# Altium PCB PCB1.PcbDoc
Units mm, origin at the board's own origin, x right, y up, seen from the top; angles counter-clockwise.
Board outline 79.5 x 40 mm, 4 copper layers (Top Layer, Inner 1, Inner 2, Bottom Layer), stack 0.603 mm thick; 62 components, 55 nets, 268 pads, 35 vias.
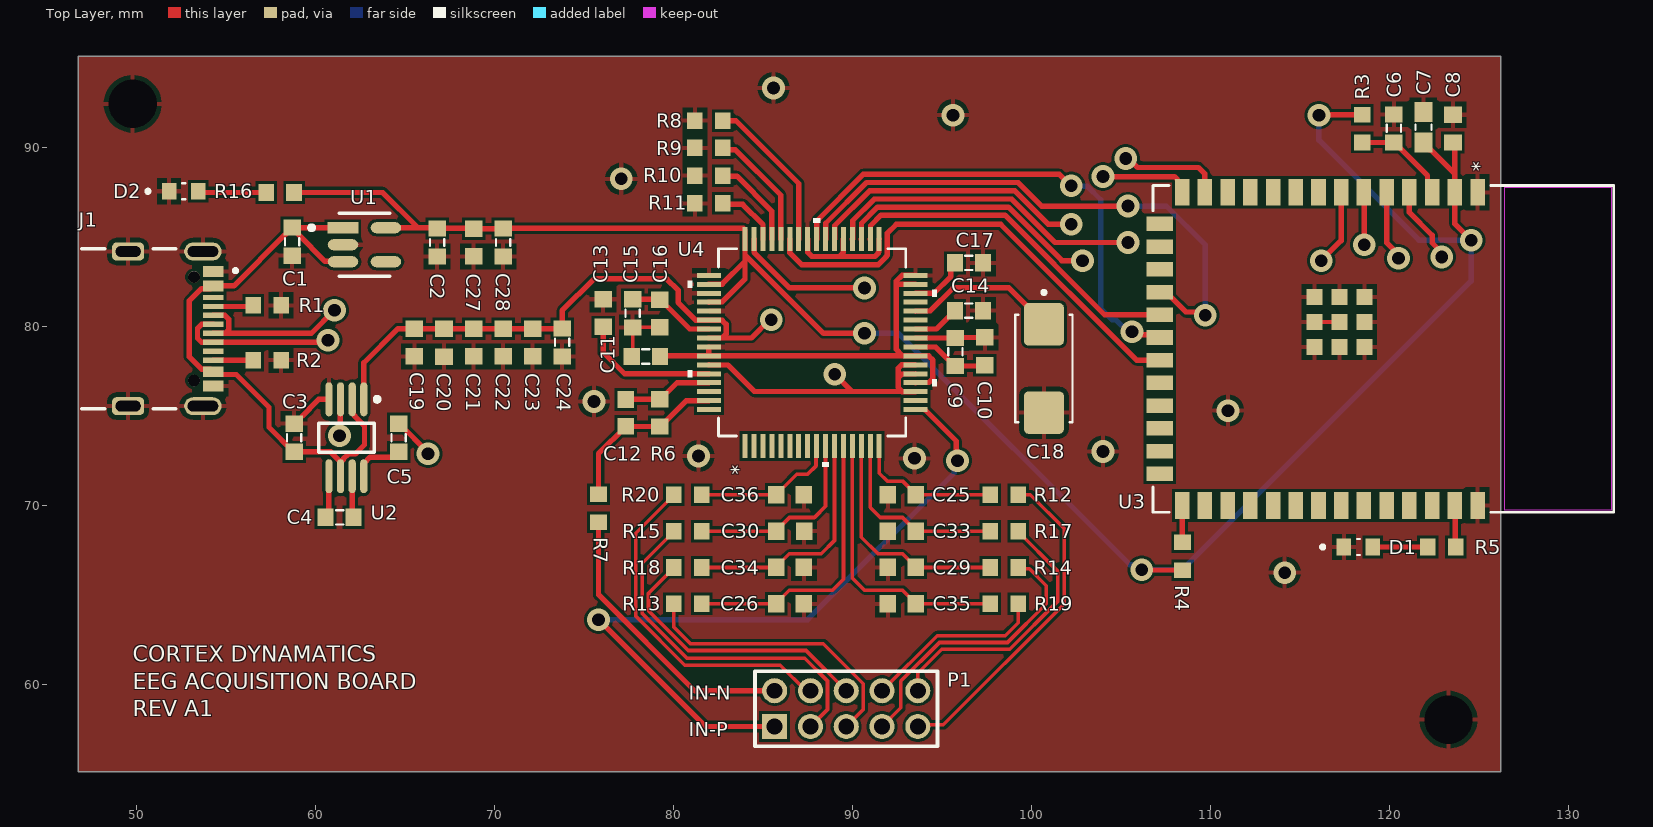
[diagram p0: Top Layer view]
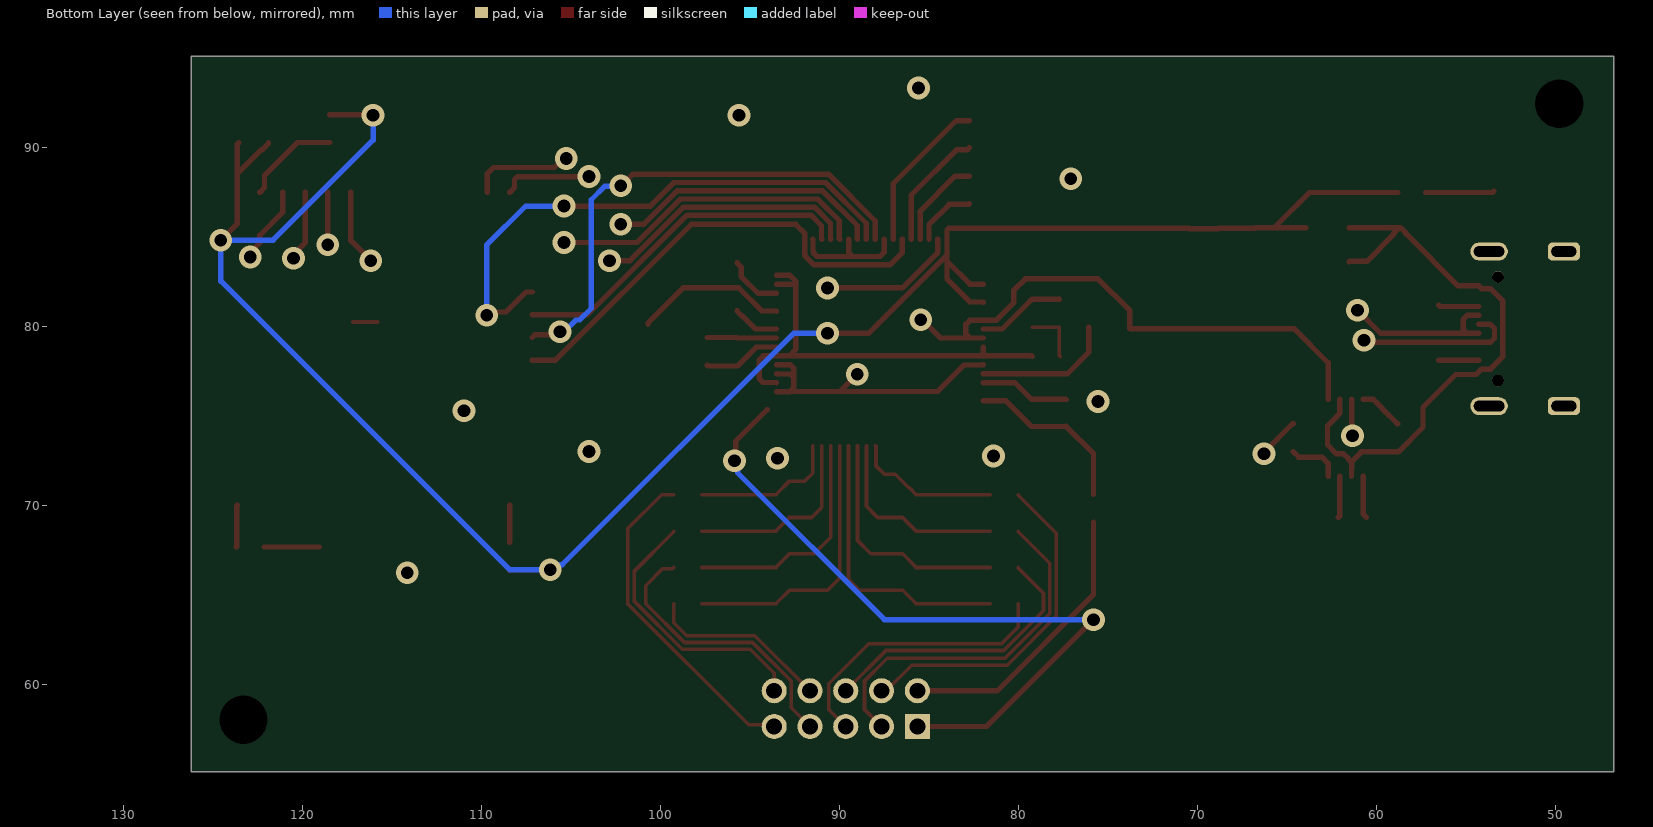
[diagram p1: Bottom Layer view, seen from below]
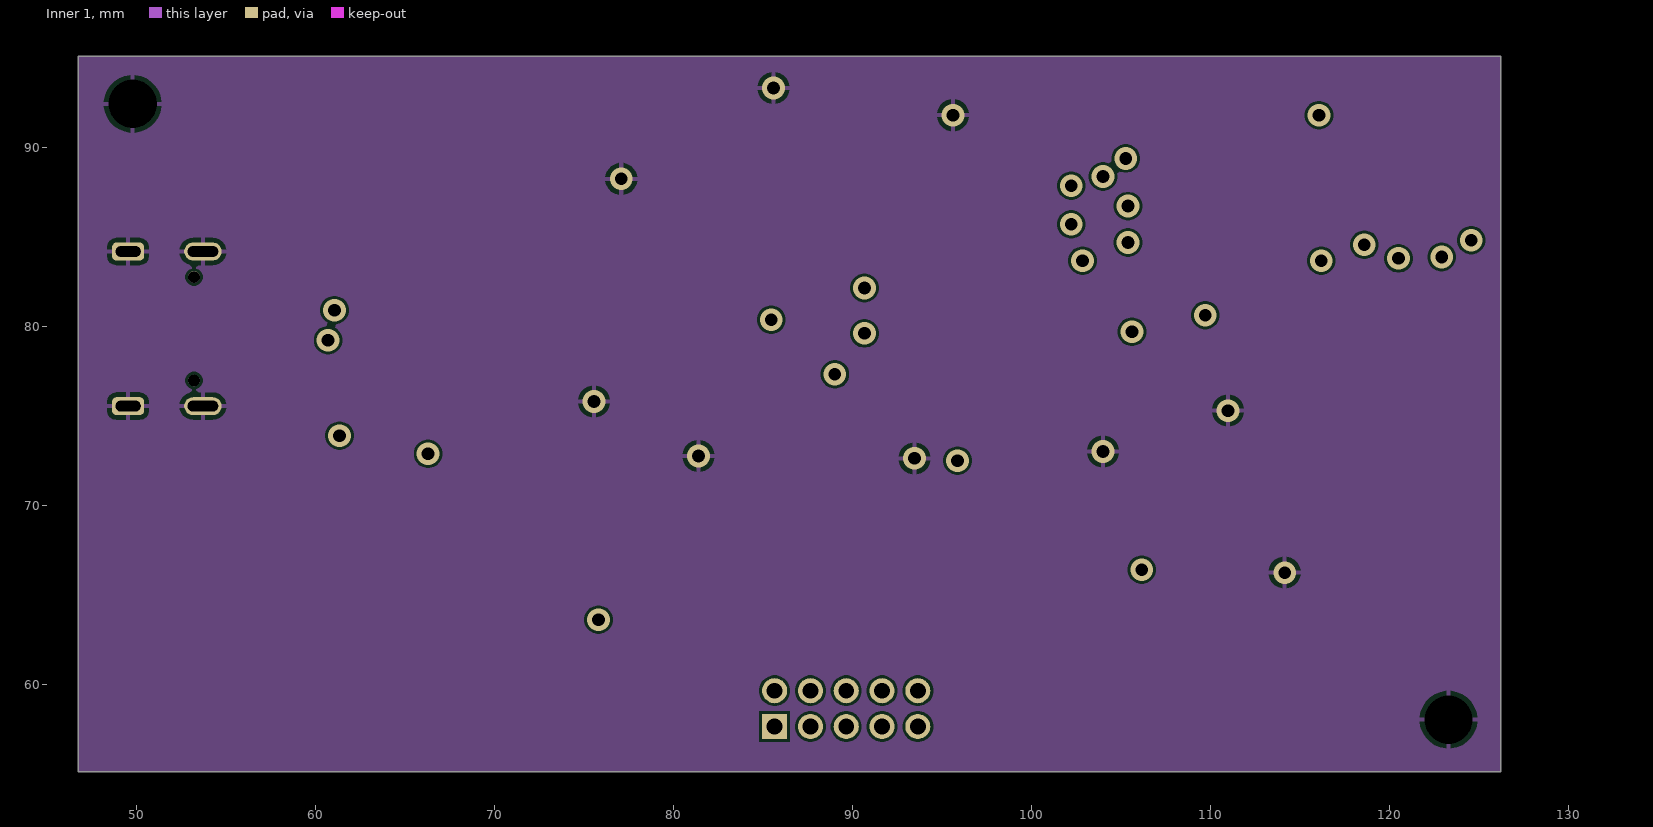
[diagram p2: Inner 1]
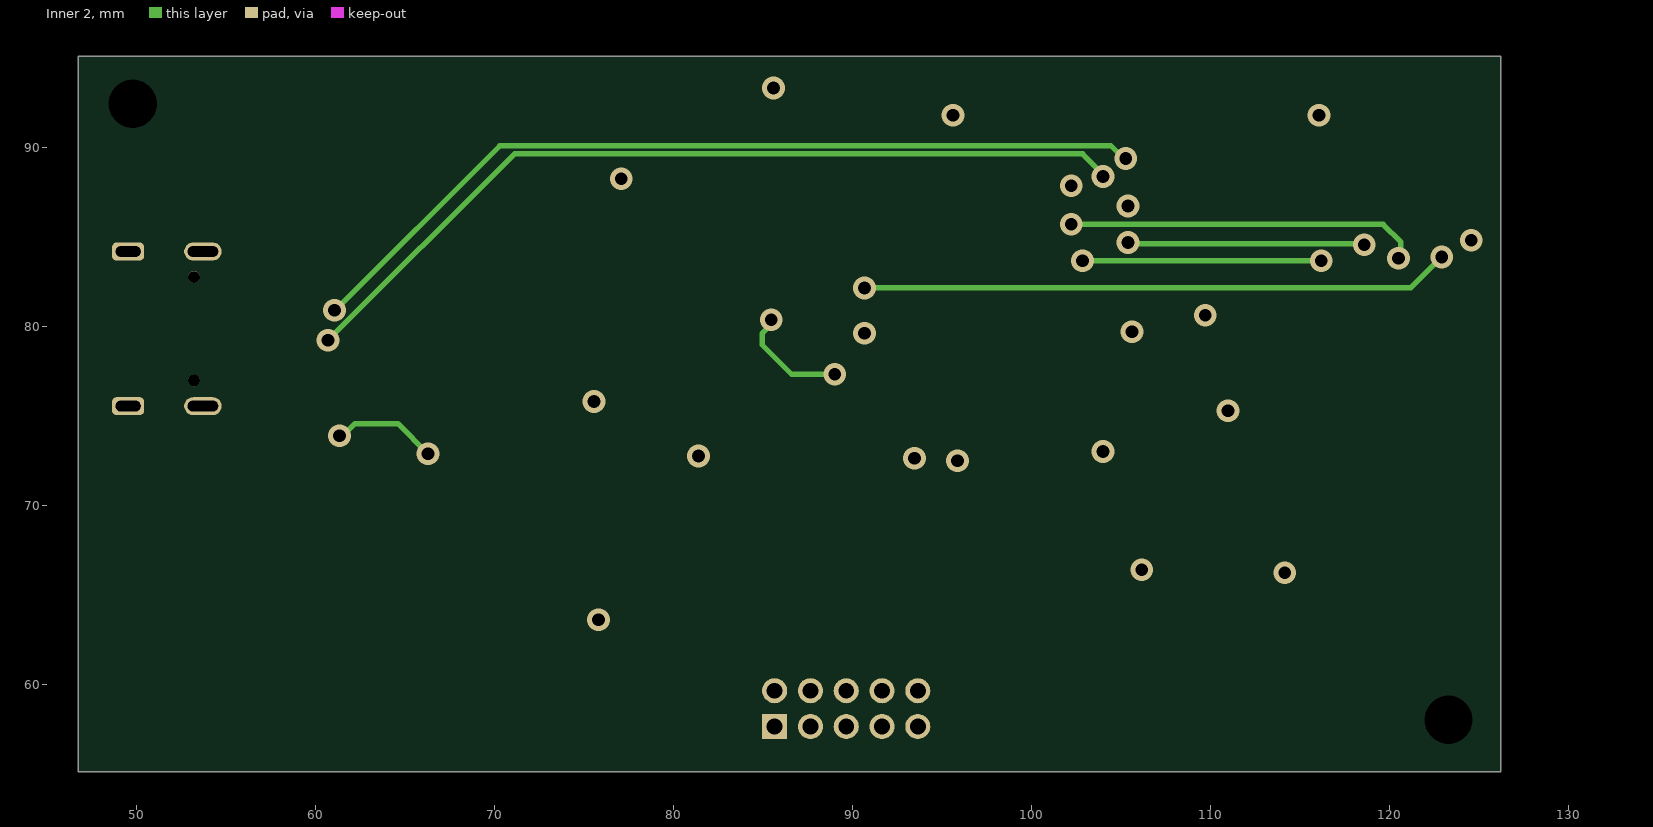
[diagram p3: Inner 2]
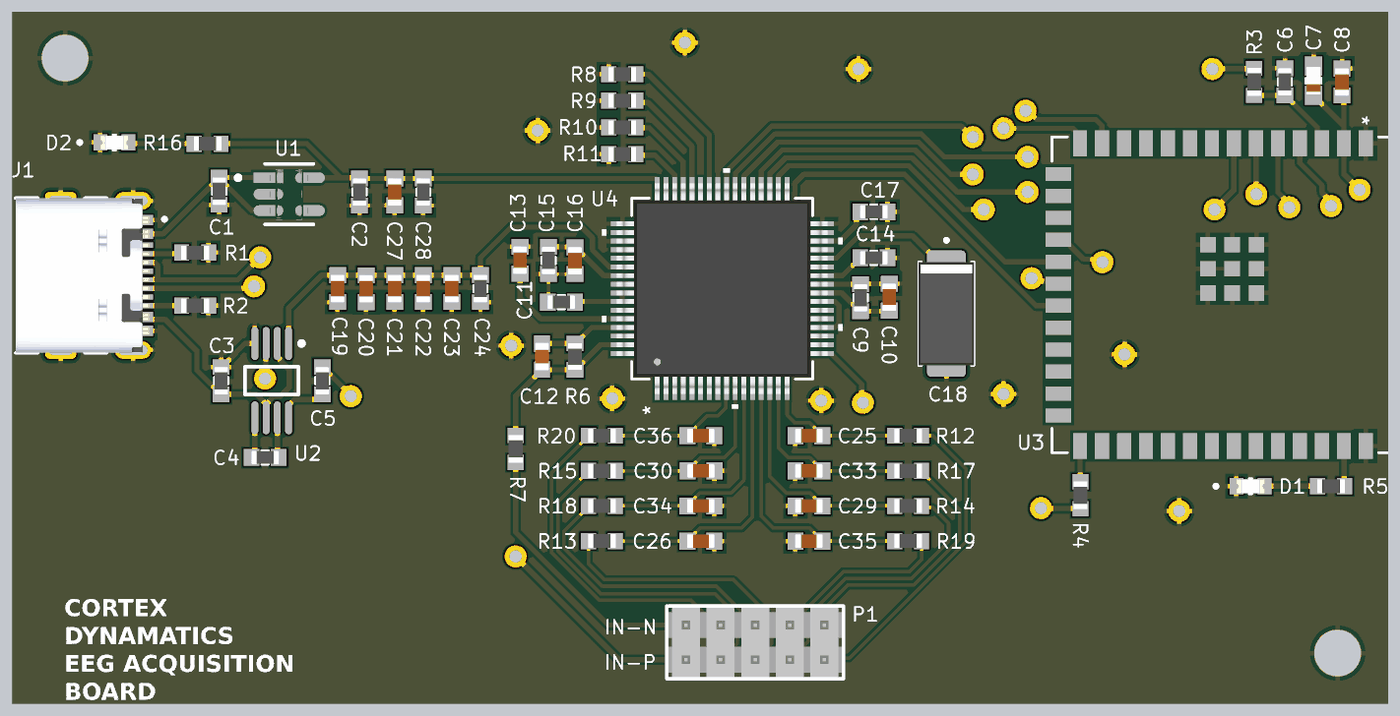
[diagram p4: 3D render of the assembled board from above, using the file's embedded part models]

## Layer stack, top to bottom
Top Solder: solder mask 0.0102, Solder Resist, Dk 3.5
Top Layer: signal copper 0.0356
Dielectric 2: prepreg 0.0711, PP-006, Dk 4.1
Inner 1: signal copper 0.035
Dielectric 1: dielectric 0.32, FR-4, Dk 4.8
Inner 2: signal copper 0.035
Dielectric 3: prepreg 0.0711, PP-006, Dk 4.1
Bottom Layer: signal copper 0.0356
Bottom Solder: solder mask 0.0102, Solder Resist, Dk 3.5

## Board outline
46.736,55.118 126.238,55.118 126.238,95.123 46.736,95.123

## Design rules (kind name [scope] priority, off if disabled: settings)
Clearance [All] p1: gap=0.152 ignorepadtopadclearanceinfootprint=FALSE
HoleSize [All] p1: absolutevalues=TRUE maxlimit=3 minlimit=0.025 maxpercent=80.000 minpercent=20.000
MinimumSolderMaskSliver [All] p1: minsoldermaskwidth=0
PolygonConnect [All] p1: connectstyle=Relief reliefconductorwidth=0.254 reliefentries=4 polygonreliefangle="90 Angle" airgapwidth=0.254
RoutingVias [All] p1: holewidth=0.711 width=1.27 viastyle="Through Hole" minholewidth=0.711 minwidth=1.27 maxholewidth=0.711 maxwidth=1.27
SilkToSilkClearance [All] p1: silktosilkclearance=0.1
SilkToSolderMaskClearance [IsPad] p1: minsilkscreentomaskgap=0.05 clearancetoexposedcopper=TRUE
SolderMaskExpansion [All] p1: expansion=0.102 istentingtop=FALSE
SupplyNets "Schematic Supply Nets" [InNet('GND')] p1: voltage=0.000
Width [All] p1: maxlimit=0.3 minlimit=0.203 preferedwidth=0.254
26 further rules are at their usual default settings.

## Components (designator, comment, footprint, x,y, rotation, side; value= is the part's Value field where it differs from the comment)
C1 "1uF" CAPC1608X95 58.693,84.755 r270 top
C2 "1uF" CAPC1608X95 66.802,84.709 r270 top
C3 "1uF" CAPC1608X95 58.806,73.796 r90 top
C4 "1uF" CAPC1608X95 61.346,69.351 r180 top
C5 "1uF" CAPC1608X95 64.648,73.796 r90 top
C6 "1uF" CAPC1608X95 120.269,91.082 r270 top
C7 "10uF" CAPC1608X90 121.92,91.147 r90 top
C8 "100nF" CAPC1608X90N 123.571,91.072 r270 top
C9 "1uF" CAPC1608X95 95.758,78.59 r270 top
C10 "100nF" CAPC1608X90N 97.409,78.626 r90 top
C11 "1uF" CAPC1608X95 78.463,78.336 r0 top
C12 "1.5nF" CAPC1608X87N 77.343,75.186 r90 top
C13 "100nF" CAPC1608X90N 76.073,80.762 r270 top
C14 "1uF" CAPC1608X95 96.52,80.899 r0 top
C15 "1uF" CAPC1608X95 77.724,80.749 r270 top
C16 "100nF" CAPC1608X90N 79.248,80.736 r90 top
C17 "1uF" CAPC1608X95 96.52,83.566 r0 top
C18 "100uF" CAPMP6032X280N 100.711,77.667 r270 top
C19 "100nF" CAPC1608X90N 65.532,79.121 r90 top
C20 "100nF" CAPC1608X90N 67.183,79.108 r90 top
C21 "100nF" CAPC1608X90N 68.834,79.121 r90 top
C22 "100nF" CAPC1608X90N 70.485,79.121 r90 top
C23 "100nF" CAPC1608X90N 72.136,79.121 r90 top
C24 "1uF" CAPC1608X95 73.787,79.121 r270 top
C25 "4.7nF" CAPC1608X90N 92.765,70.612 r0 top
C26 "4.7nF" CAPC1608X90N 86.522,64.516 r180 top
C27 "100nF" CAPC1608X90N 68.834,84.709 r90 top
C28 "1uF" CAPC1608X95 70.485,84.709 r270 top
C29 "4.7nF" CAPC1608X90N 92.765,66.548 r0 top
C30 "4.7nF" CAPC1608X90N 86.535,68.58 r180 top
C33 "4.7nF" CAPC1608X90N 92.765,68.58 r180 top
C34 "4.7nF" CAPC1608X90N 86.522,66.548 r0 top
C35 "4.7nF" CAPC1608X90N 92.765,64.516 r180 top
C36 "4.7nF" CAPC1608X90N 86.522,70.612 r0 top
D1 "LED_RED" LEDC1608X35N 118.285,67.691 r0 top
D2 "LED_RED" LEDC1608X35N 52.633,87.571 r0 top
J1 "USB4105GFA" GCT_USB4105GFA 49.53,79.883 r270 top
P1 "MTMM-105-04-F-D-135" SMTC-MTMM-105-04-X-D-135 85.662,57.658 r0 top
R1 "5.1k" RESC1608X55N 57.301,81.198 r180 top
R2 "5.1k" RESC1608X55N 57.301,78.137 r0 top
R3 "10k" RESC1608X55N 118.491,91.077 r270 top
R4 "10k" RESC1608X55N 108.458,67.165 r270 top
R5 "1k" RESC1608X55N 122.936,67.691 r180 top
R6 "1MR" RESC1508X55N 79.248,75.186 r90 top
R7 "100k" RESC1608X55N 75.819,69.85 r90 top
R8 "10k" RESC1608X55N 81.981,91.52 r180 top
R9 "10k" RESC1608X55N 81.981,89.995 r180 top
R10 "10k" RESC1608X55N 81.981,88.443 r180 top
R11 "10k" RESC1608X55N 81.981,86.896 r180 top
R12 "1k" RESC1608X55N 98.498,70.612 r180 top
R13 "1k" RESC1608X55N 80.802,64.516 r0 top
R14 "1k" RESC1608X55N 98.498,66.548 r180 top
R15 "1k" RESC1608X55N 80.802,68.58 r0 top
R16 "1k" RESC1608X55N 58.021,87.503 r180 top
R17 "1k" RESC1608X55N 98.498,68.58 r180 top
R18 "1k" RESC1608X55N 80.802,66.548 r0 top
R19 "1k" RESC1608X55N 98.498,64.516 r180 top
R20 "1k" RESC1608X55N 80.802,70.612 r0 top
U1 "AP2112K-3.3TRG1" FP-SOT25-IPC_A 62.738,84.582 r0 top
U2 "TPS60241DGKRG4" TI-DGK8_M 61.727,73.796 r270 top
U3 "ESP32-S3-WROOM-1-N8" ESP32-S3-WROOM-1_EXP 119.684,78.764 r270 top
U4 "ADS1299-4PAGR" PAG64_TEX 87.757,79.121 r90 top

## Footprints (in the part's own frame and the unit in brackets; to place one, negate y for a bottom-side part, rotate by r counter-clockwise, add the part's x,y. Pads: shape width x height; smd on the part's side, far side on the other; paste and mask are expansions set on the pad)
CAPC1608X87N [mm]
  rect 0.94x0.93 smd: 1(-0.745,0) 2(0.745,0)
  body extent -0.8,-0.4 0.8,0.4, height 0.95
CAPC1608X90 [mm]
  rect 1.1x1 smd paste+0 mask+0.102: 1(-0.85,0) 2(0.85,0)
  silkscreen extent -0.15,-0.45 0.15,0.45, body extent -0.8,-0.43 0.8,0.43, height 1
CAPC1608X90N [mm]
  rect 0.92x0.98 smd: 1(-0.775,0) 2(0.775,0)
  body extent -0.8,-0.41 0.8,0.41, height 0.9
CAPC1608X95 [mm]
  rect 0.9x0.97 smd: 1(-0.785,0) 2(0.785,0)
  silkscreen extent -0.2,-0.4 0.2,0.4, body extent -0.8,-0.4 0.8,0.4, height 0.95
CAPMP6032X280N [mm]
  rrect22% 2.37x2.23 smd paste+0 mask+0.102: 1(-2.47,0) 2(2.47,0)
  silkscreen extent -4.35,-1.6 3,1.6, body extent -3,-1.6 3,1.6, height 2.8
ESP32-S3-WROOM-1_EXP [mil]
  rect 59x32 smd paste+0 mask+0: 1(-344.49,207.09) 2(-344.49,157.09) 3(-344.49,107.09) 4(-344.49,57.09) 5(-344.49,7.09) 6(-344.49,-42.91) 7(-344.49,-92.91) 8(-344.49,-142.91) 9(-344.49,-192.91) 10(-344.49,-242.91) 11(-344.49,-292.91) 12(-344.49,-342.91) 13(-344.49,-392.91) 14(-344.49,-442.91) 27(344.49,-442.91) 28(344.49,-392.91) 29(344.49,-342.91) 30(344.49,-292.91) 31(344.49,-242.91) 32(344.49,-192.91) 33(344.49,-142.91) 34(344.49,-92.91) 35(344.49,-42.91) 36(344.49,7.09) 37(344.49,57.09) 38(344.49,107.09) 39(344.49,157.09) 40(344.49,207.09)
  rect 32x59 smd paste+0 mask+0: 15(-275,-492.13) 16(-225,-492.13) 17(-175,-492.13) 18(-125,-492.13) 19(-75,-492.13) 20(-25,-492.13) 21(25,-492.13) 22(75,-492.13) 23(125,-492.13) 24(175,-492.13) 25(225,-492.13) 26(275,-492.13)
  rect 35x35 smd paste+0 mask+0: 41(-59.06,-96.85) 42(-114.17,-41.73) 43(-114.17,-96.85) 44(-114.17,-151.97) 45(-59.06,-151.97) 46(-3.94,-151.97) 47(-3.94,-96.85) 48(-3.94,-41.73) 49(-59.06,-41.73)
  Top Layer keep-out region: 354.5,502 -354.5,502 -354.5,266 354.5,266
  silkscreen extent -360,-507 360,507
FP-SOT25-IPC_A [mm]
  rect 1.707x0.616 smd paste+0 mask+0: 1(-1.201,0.95)
  rrect100% 1.707x0.616 smd paste+0 mask+0: 2(-1.201,0) 3(-1.201,-0.95) 4(1.201,-0.95) 5(1.201,0.95)
  silkscreen extent -3.08,-1.75 1.4,1.75, body extent -2.55,-2 2.55,2, height 0.25
GCT_USB4105GFA [mm]
  rect 0.6x1.15 smd: A1_B12(-3.2,4.755) A4_B9(-2.4,4.755) B1_A12(3.2,4.755) B4_A9(2.4,4.755)
  rect 0.3x1.15 smd: A5(-1.25,4.755) A6(-0.25,4.755) A7(0.25,4.755) A8(1.25,4.755) B5(1.75,4.755) B6(0.75,4.755) B7(-0.75,4.755) B8(-1.75,4.755)
  oval 1x2.1 hole 0.6 slot 1.7 at 90 deg: SH1(-4.32,4.18) SH2(4.32,4.18)
  rrect50% 1x1.8 hole 0.6 slot 1.4 at 90 deg: SH3(-4.32,0) SH4(4.32,0)
  round 0.65 hole 0.65 unplated: ""(-2.89,3.68) ""(2.89,3.68)
  silkscreen extent -4.47,-2.6 4.47,6.1, body extent -4.47,-2.6 4.47,5.11, height 3.31
LEDC1608X35N [mm]
  rect 0.81x0.93 smd: A(0.81,0) C(-0.81,0)
  silkscreen extent -2.1,-0.45 0.09,0.45, body extent -0.8,-0.4 0.8,0.4, height 0.8
PAG64_TEX [mm]
  rect 1.341x0.279 smd paste+0 mask+0: 1(-5.776,3.75) 2(-5.776,3.25) 3(-5.776,2.75) 4(-5.776,2.25) 5(-5.776,1.75) 6(-5.776,1.25) 7(-5.776,0.75) 8(-5.776,0.25) 9(-5.776,-0.25) 10(-5.776,-0.75) 11(-5.776,-1.25) 12(-5.776,-1.75) 13(-5.776,-2.25) 14(-5.776,-2.75) 15(-5.776,-3.25) 16(-5.776,-3.75) 33(5.776,-3.75) 34(5.776,-3.25) 35(5.776,-2.75) 36(5.776,-2.25) 37(5.776,-1.75) 38(5.776,-1.25) 39(5.776,-0.75) 40(5.776,-0.25) 41(5.776,0.25) 42(5.776,0.75) 43(5.776,1.25) 44(5.776,1.75) 45(5.776,2.25) 46(5.776,2.75) 47(5.776,3.25) 48(5.776,3.75)
  rect 0.279x1.341 smd paste+0 mask+0: 17(-3.75,-5.776) 18(-3.25,-5.776) 19(-2.75,-5.776) 20(-2.25,-5.776) 21(-1.75,-5.776) 22(-1.25,-5.776) 23(-0.75,-5.776) 24(-0.25,-5.776) 25(0.25,-5.776) 26(0.75,-5.776) 27(1.25,-5.776) 28(1.75,-5.776) 29(2.25,-5.776) 30(2.75,-5.776) 31(3.25,-5.776) 32(3.75,-5.776) 49(3.75,5.776) 50(3.25,5.776) 51(2.75,5.776) 52(2.25,5.776) 53(1.75,5.776) 54(1.25,5.776) 55(0.75,5.776) 56(0.25,5.776) 57(-0.25,5.776) 58(-0.75,5.776) 59(-1.25,5.776) 60(-1.75,5.776) 61(-2.25,5.776) 62(-2.75,5.776) 63(-3.25,5.776) 64(-3.75,5.776)
  silkscreen extent -6.95,-6.95 6.95,6.95, body extent -6.1,-6.1 6.1,6.1, height 1.2
RESC1508X55N [mm]
  rect 0.9x0.97 smd paste+0 mask+0.102: 1(-0.76,0) 2(0.76,0)
  body extent -0.77,-0.4 0.77,0.4, height 0.55
RESC1608X55N [mm]
  rect 0.87x0.93 smd: 1(-0.78,0) 2(0.78,0)
  body extent -0.8,-0.4 0.8,0.4, height 0.55
SMTC-MTMM-105-04-X-D-135 [mm] "Terminal Strip Assembly, 2x5 Pins, Vertical, 2mm Pitch, Male"
  rect 1.4x1.4 hole 0.89: 1(0,0)
  round 1.4 hole 0.89: 2(0,2) 3(2,0) 4(2,2) 5(4,0) 6(4,2) 7(6,0) 8(6,2) 9(8,0) 10(8,2)
  silkscreen extent -1.1,-1.1 9.1,3.1, body extent -1,-1 9,3, height 4.93
TI-DGK8_M [mm] "SOP, 8-Leads, Body 3x3mm, Pitch 0.65mm, IPC Low Density"
  oval 1.9x0.4 smd: 1(-2.15,0.975) 2(-2.15,0.325) 3(-2.15,-0.325) 4(-2.15,-0.975) 5(2.15,-0.975) 6(2.15,-0.325) 7(2.15,0.325) 8(2.15,0.975)
  silkscreen extent -2.27,-1.55 0.8,1.85, body extent -1.55,-1.55 1.55,1.55, height 1.1

## Part data
C1 C2 C3 C4 C5 C6 C9 C11 C14 C15 C17 C24 C28: library part 1uF_0603, "1 ÂµF Â±10% 16V Ceramic Capacitor X7R 0603 (1608 Metric)", Package="0603 TDK", Check_prices=https://www.snapeda.com/parts/C1608X7R1C105K/TDK/view-part/?ref=eda, MF=TDK, MP=C1608X7R1C105K, SnapEDA_Link=https://www.snapeda.com/parts/C1608X7R1C105K/TDK/view-part/?ref=snap
C7: library part 10uF_0603, "TACmicrochip,10 uF,6.3 V", Package="603-2 AVX", Check_prices=https://www.snapeda.com/parts/TACL106K006RTA/AVX/view-part/?ref=eda, MF=AVX, MP=TACL106K006RTA, SnapEDA_Link=https://www.snapeda.com/parts/TACL106K006RTA/AVX/view-part/?ref=snap
C8 C10 C13 C16 C19 C20 C21 C22 C23 C27: library part 100nF_0603, "Capacitor MLCC 0603 100nF 16V", Package="1608 AVX", Check_prices=https://www.snapeda.com/parts/0603YC104KAZ2A/AVX/view-part/?ref=eda, MF=AVX, MP=0603YC104KAZ2A, SnapEDA_Link=https://www.snapeda.com/parts/0603YC104KAZ2A/AVX/view-part/?ref=snap
C12: library part 1.5nF_0603, "0603 X7R ceramic capacitor, 100V 1.5nF", Package="1608 KEMET", Check_prices=https://www.snapeda.com/parts/C0603C152K1RACTU/Kemet/view-part/?ref=eda, MF=Kemet, MP=C0603C152K1RACTU, SnapEDA_Link=https://www.snapeda.com/parts/C0603C152K1RACTU/Kemet/view-part/?ref=snap
C18: library part 100uF_tantalum_6032, "100 ÂµF Molded Tantalum Capacitors 10 V 2312 (6032 Metric) 200mOhm", Package=Package, Check_prices=https://www.snapeda.com/parts/593D107X9010C2TE3/Vishay/view-part/?ref=eda, MF="Vishay Sprague", MP=593D107X9010C2TE3, SnapEDA_Link=https://www.snapeda.com/parts/593D107X9010C2TE3/Vishay/view-part/?ref=snap
C25 C26 C29 C30 C33 C34 C35 C36: library part 4.7nF_ceramic_0603, "C Series 0603 4.7 nF 25 V ±5 % Tolerance C0G SMT Multilayer Ceramic Capacitor", Package="1608 TDK", Check_prices=https://www.snapeda.com/parts/C1608C0G1E472J080AA/TDK/view-part/?ref=eda, MF=TDK, MP=C1608C0G1E472J080AA, SnapEDA_Link=https://www.snapeda.com/parts/C1608C0G1E472J080AA/TDK/view-part/?ref=snap
D1 D2: "Red 631nm LED Indication - Discrete 2V 0603 (1608 Metric)", Package="0603 Lite-On", Availability="In Stock", Check_prices=https://www.snapeda.com/parts/LTST-C190KRKT/Lite-On+Inc./view-part/?ref=eda, MF="Lite-On Inc.", MP=LTST-C190KRKT, Price=None, Purchase-URL=https://pricing.snapeda.com/search/part/LTST-C190KRKT/?ref=eda, SnapEDA_Link=https://www.snapeda.com/parts/LTST-C190KRKT/Lite-On+Inc./view-part/?ref=snap
J1: "USB-C (USB TYPE-C) USB 2.0 Receptacle Connector 24 (16+8 Dummy) Position Surface Mount, Right Angle; Through Hole", Package=None, Check_prices=https://www.snapeda.com/parts/USB4105GFA/Global+Connector+Technology/view-part/?ref=eda, MF="Global Connector Technology", MP=USB4105GFA, SnapEDA_Link=https://www.snapeda.com/parts/USB4105GFA/Global+Connector+Technology/view-part/?ref=snap
P1: library part CMP-1029-00113-1, "Modified Through-Hole Header, Vertical, -55 to 125 degC, 2 mm Pitch, 10-Pin, Male, RoHS", Manufacturer=Samtec, Temperature Range="-55 to 125 degC", ComponentLink1Description="Manufacturer URL", ComponentLink1URL=http://www.samtec.com, ComponentLink2Description=Datasheet, ComponentLink2URL=http://d2a072wq521u33.cloudfront.net/catalog_english//MTMM_TH.PDF, ComponentLink3Description="Package Specification", ComponentLink3URL=http://www.samtec.com/documents/webfiles/cpdf/MTMM-1XX-XX-XX-X-XXX-XX-XXX-MKT.pdf, DatasheetVersion=F-214, Mounting Technology=Through-hole, Orientation=Vertical, PackageDescription="2mm Terminal Strip Assembly", PackageReference=MTMM-105-04-X-D-135, PackageVersion="AE, 12/1993", PartNumber=MTMM-105-04-F-D-135, Pitch="2 mm", RoHS=True
R1 R2: library part 5.1kR_0603, "Res Thick Film 0603 5.1K Ohm 1% 0.1W(1/10W) Â±100ppm/Â°C Pad SMD Automotive T/R", Package="1608 Yageo", Check_prices=https://www.snapeda.com/parts/AC0603FR-135K1L/Yageo/view-part/?ref=eda, MF=Yageo, MP=AC0603FR-135K1L, SnapEDA_Link=https://www.snapeda.com/parts/AC0603FR-135K1L/Yageo/view-part/?ref=snap
R3 R4 R8 R9 R10 R11: library part 10kR_0603, "Resistor, AS 0603 10k 1% 100mW TC100", Package="0603-2 Bourns", Check_prices=https://www.snapeda.com/parts/CR0603AFX-1002EAS/Bourns/view-part/?ref=eda, MF=Bourns, MP=CR0603AFX-1002EAS, SnapEDA_Link=https://www.snapeda.com/parts/CR0603AFX-1002EAS/Bourns/view-part/?ref=snap
R5 R12 R13 R14 R15 R16 R17 R18 R19 R20: library part 1kR_0603, "DirenÃ§, AS 0603 1k %1 100mW TC100", Package="0603-2 Bourns", Check_prices=https://www.snapeda.com/parts/CR0603AFX-1001EAS/Bourns/view-part/?ref=eda, MF=Bourns, MP=CR0603AFX-1001EAS, SnapEDA_Link=https://www.snapeda.com/parts/CR0603AFX-1001EAS/Bourns/view-part/?ref=snap
R6: library part 1MR_0603, "Precision Thin Film Smnt Resistor 0603 Case 1MOhm +/-0.1% 0.063W +/-25ppm/C", Package=0603, Power_Rating=".063 W", Resistance=1M, Tolerance=.1%, Voltage_Rating="50 V", Check_prices=https://www.snapeda.com/parts/CPF0603B1M0E/TE+Connectivity+Passive+Product/view-part/?ref=eda, EU_RoHS_Compliance=Compliant, MF="TE Connectivity", MP=CPF0603B1M0E, SnapEDA_Link=https://www.snapeda.com/parts/CPF0603B1M0E/TE+Connectivity+Passive+Product/view-part/?ref=snap
R7: library part 100kR_0603, "Fixed Resistor CRGCQ 0603 100K 5%", Package="0603-2 TE Connectivity", Check_prices=https://www.snapeda.com/parts/CRGCQ0603J100K/TE+Connectivity/view-part/?ref=eda, MF="TE Connectivity", MP=CRGCQ0603J100K, SnapEDA_Link=https://www.snapeda.com/parts/CRGCQ0603J100K/TE+Connectivity/view-part/?ref=snap
U1: library part CMP-12756-000035-1, "IC REG LINEAR 3.3V 600MA SOT25", Case/Package=SOT-23-5, Dropout Voltage=250mV, Max Input Voltage=6V, Max Operating Temperature=85°C, Max Output Current=600mA, Min Input Voltage=2.5V, Min Operating Temperature=-40°C, Output Voltage=3.3V, Package Quantity=1, Quiescent Current=55uA, Accuracy=1.5%, Height=1.3mm, Lead Free="Lead Free", Length=3.1mm, Mount="Surface Mount", Number of Outputs=1, Number of Pins=5, Number of Regulators=1, Output Current=600mA, Output Type=Fixed, Packaging="Tape and Reel", Polarity=Positive, Width=1.7mm
U2: library part CMP-0391-00067-1, "5 V, Boost Charge Pump, 25 mA, 2.7 to 5.5 V Input with 2-Cell Alkaline / Nixx Input, -40 to 85 degC, 8-pin SOP (DGK8), Green (RoHS & no Sb/Br)", Manufacturer="Texas Instruments", Switching Frequency(Max)(kHz)=220, 2-Cell Alkaline/Nixx Input=TRUE, Code_JEDEC=MO-187, ComponentLink1Description="Manufacturer URL", ComponentLink1URL=http://www.ti.com/, ComponentLink2Description=Datasheet, ComponentLink2URL=http://www.ti.com/general/docs/lit/getliterature.tsp?genericPartNumber=TPS60241&fileType=pdf, ComponentLink3Description="Package Specification", ComponentLink3URL=http://www.ti.com/litv/pdf/mpds028d, DatasheetVersion=SLVS372B, Eco-Plan="Green (RoHS & no Sb/Br)", Efficiency(Typ)(%)=90.8, Iout(Max)(A)=0.025, Iq(Typ)(mA)=0.25, Mounting Technology="Surface Mount", PackageDescription="8-Pin Thin Small Outline Package 3 x 3 mm Body ,0.65 mm Pitch", PackageReference=DGK8, PackageVersion=4073329/E, PartNumber=TPS60241DGKRG4, Preset Vout(V)=5, Topology=Boost, Vin(Max)(V)=5.5, Vin(Min)(V)=2.7, Vout(Max)(V)=5.125, Vout(Min)(V)=4.875
U3: "Description", Manufacturer_Name="Espressif Systems", Copyright="Copyright (C) 2026 Ultra Librarian. All rights reserved.", Manufacturer_Part_Number=ESP32-S3-WROOM-1-N8, RefDes=RefDes, Type="Transceiver module"
U4: "Low-Noise, 4-Channel, 24-Bit Analog-to-Digital Converter for Biopotential Measurements 64-TQFP -40 to 85", Manufacturer_Name="Texas Instruments", Copyright="Copyright (C) 2025 Ultra Librarian. All rights reserved.", Manufacturer_Part_Number=ADS1299-4PAGR, RefDes=RefDes, Type=Type

## Free pads (board coordinates)
  round 0.889 hole 2.7: e(123.317,58.039) M1(49.784,92.456)

## Via types
v1: diameter 1.27, hole 0.711, Top Layer to Bottom Layer, 35 vias

## Nets (pads, with @x,y where several pads share a name; then routed paths per layer and width w, separated by ;. In a path a pad name is that pad's centre, name@x,y a point inside that pad or via, vN(x,y) a via of type N, cw(c..) or ccw(c..) an arc to the next point about the centre after c; other vN are vias at no path point)
3V3: C2.1 C7.1 C8.2 C27.2 C28.1 R3.1 R4.2 R16.1 U1.5 U3.2 U4.48 U4.50 U4.52 | length 117.9
  Top Layer w0.3: R16.1 63.754,87.503 65.725,85.532 ; U1.5 65.725,85.532 ; U4.52 81.992,81.381 82.729,81.381 84.007,82.659 84.007,83.659 ; U4.50 81.992,82.381 82.729,82.381 84.007,83.659 ; v1(90.678,79.629) 88.392,79.629 84.007,84.014 ; v1(106.172,66.421) 106.19,66.403 108.44,66.403 R4.2 ; v1(116.078,91.821) 116.096,91.839 118.473,91.839 R3.1 ; C7.1 121.92,90.247 122.27,89.897 122.32,89.897 123.674,88.543 ; C8.2 123.674,90.194 123.674,88.543 ; v1(124.587,84.836) 123.674,85.749 U3.2 123.674,88.543 ; 65.725,85.532 66.764,85.532 C2.1 68.824,85.494 C27.2 70.475,85.484 C28.1 83.92,85.494 84.007,85.407 U4.48 84.007,84.014 ; 84.007,83.659 84.007,84.014
  Bottom Layer w0.3: v1(90.678,79.629) 92.583,79.629 105.514,66.698 105.633,66.698 105.91,66.421 v1(106.172,66.421) 108.458,66.421 124.587,82.55 v1(124.587,84.836) 121.666,84.836 116.078,90.424 v1(116.078,91.821)
5V: C19.2 C20.2 C21.2 C22.2 C23.2 C24.1 U2.1 U4.19 U4.21 U4.22 U4.54 U4.56 U4.59 | length 54.5
  Top Layer w0.3: U2.1 62.702,77.988 64.61,79.896 C19.2 67.17,79.896 C20.2 67.196,79.896 C21.2 C22.2 C23.2 73.777,79.896 73.789,79.908 73.789,80.901 75.565,82.677 79.629,82.677 80.264,82.042 80.264,81.351 81.009,80.606 81.244,80.371 U4.54 81.992,80.361 82.729,80.361 82.954,80.136 82.954,79.606 82.719,79.371 ; U4.59 81.992,77.861 83.048,77.861 84.528,76.381 89.989,76.381 ; U4.56 81.983,79.373 82.719,79.373 84.361,79.373 85.379,80.391 v1(85.471,80.391) ; v1(89.027,77.343) 89.989,76.381 ; 92.785,76.371 U4.19 ; U4.21 93.522,77.361 92.782,77.361 92.56,77.139 ; U4.22 92.759,77.871 92.56,77.672 92.56,77.139 ; 89.989,76.381 92.785,76.381 92.56,76.606 92.56,77.139
  Inner 2 w0.3: v1(85.471,80.391) 85.471,80.129 84.963,79.621 84.963,78.994 86.614,77.343 v1(89.027,77.343)
BIAS_ELECTRODE: P1.2 R7.1 | length 16.1
  Top Layer w0.3: R7.1 75.819,65.024 81.185,59.658 P1.2
BIASINV: C12.2 R6.2 U4.61 | length 5
  Top Layer w0.3: C12.2 77.358,75.946 R6.2 ; R6.2@79.283,75.946 80.208,76.871 U4.61
BIASOUT: C12.1 R6.1 R7.2 U4.63 | length 9.7
  Top Layer w0.3: R7.2 75.819,72.912 77.343,74.436 C12.1 77.358,74.426 R6.1 ; R6.1@79.283,74.426 80.728,75.871 U4.63
CS: U3.18 U4.39 | length 31.5
  Top Layer w0.3: U4.39 88.517,84.907 88.517,85.784 90.792,88.059 99.266,88.059 100.584,86.741 v1(105.41,86.741) ; U3.18 107.527,81.939 108.643,80.823 109.55,80.823 v1(109.728,80.645)
  Bottom Layer w0.3: v1(105.41,86.741) 107.545,86.741 109.728,84.558 v1(109.728,80.645)
D+: J1.A6 J1.B6 U3.14 | length 62.2
  Top Layer w0.3: J1.A6 53.632,80.133 53.408,79.908 53.408,79.358 53.632,79.133 60.591,79.133 v1(60.706,79.248) ; v1(104.013,88.392) 108.002,88.392 108.178,88.216 108.178,87.77 U3.14
  Inner 2 w0.3: v1(60.706,79.248) 71.12,89.662 102.87,89.662 104.013,88.519 v1(104.013,88.392)
D-: J1.A7 J1.B7 U3.13 | length 63.3
  Top Layer w0.3: J1.A7 54.938,79.633 ; J1.B7 54.938,80.633 55.162,80.408 55.162,79.858 54.938,79.633 ; v1(61.059,80.927) 59.765,79.633 54.938,79.633 ; v1(105.283,89.408) 105.436,89.408 105.944,88.9 109.347,88.9 109.704,88.543 U3.13
  Inner 2 w0.3: v1(61.059,80.927) 61.115,80.927 70.302,90.114 104.455,90.114 105.161,89.408 v1(105.283,89.408)
DRDY: U3.4 U4.47 | length 45.1
  Top Layer w0.3: U4.47 84.517,84.886 84.517,84.149 86.497,82.169 v1(90.678,82.169) ; U3.4 121.134,86.384 122.404,85.114 122.404,84.693 122.936,84.161 v1(122.936,83.899)
  Inner 2 w0.3: v1(90.678,82.169) 121.206,82.169 v1(122.936,83.899)
GND: C1.2 C2.2 C3.2 C6.1 C7.2 C8.1 C9.1 C10.2 C11.1 C11.2 C13.1 C14.2 C15.2 C16.1 C17.2 C18.2 C19.1 C20.1 C21.1 C22.1 C23.1 C24.2 C25.1 C26.1 C27.1 C28.2 C29.1 C30.1 C33.2 C34.2 C35.2 C36.2 D1.C D2.C J1.A1_B12 J1.B1_A12 J1.SH1 J1.SH2 J1.SH3 J1.SH4 pad.e pad.M1 R1.1 R2.2 R8.2 R9.2 R10.2 R11.2 U1.2 U2.4 U3.1 U3.40 U3.41 U3.42 U3.43 U3.44 U3.45 U3.46 U3.47 U3.48 U3.49 U4.20 U4.23 U4.25 U4.31 U4.32 U4.33 U4.37 U4.41 U4.49 U4.51 U4.53 U4.57 U4.58 | length 42.3
  Top Layer w0.203: C11.1 77.724,78.382 C15.2 77.727,79.961 C16.1 ; U3.45 U3.41
  Top Layer w0.3: C3.2 58.841,74.581 59.656,75.396 59.656,75.431 60.171,75.946 U2.4 ; C11.2 79.283,78.371 U4.58 ; U4.57 U4.58 ; U4.41 87.517,84.886 87.517,84.149 87.742,83.924 89.272,83.924 ; U4.37 89.497,84.886 89.497,84.149 89.272,83.924 ; U4.33 91.497,84.886 91.497,84.184 91.449,84.137 91.449,84.101 91.272,83.924 89.272,83.924 ; U4.20 93.543,76.881 94.281,76.881 94.505,77.106 94.505,78.136 94.27,78.371 U4.23 92.795,78.371 ; U4.25 95.754,79.371 C9.1 95.784,79.401 C10.2 ; U4.31 92.531,82.371 92.456,82.296 ; U4.32 92.777,82.871 92.456,82.55 92.456,82.296 ; U4.58 92.795,78.371 ; 92.456,82.296 92.456,78.74 92.56,78.636 92.56,78.606 92.795,78.371
  other v1: 114.164,66.258 93.472,72.644 81.407,72.771 104.013,73.025 110.998,75.311 75.565,75.819 77.089,88.265 95.631,91.821 85.598,93.345
IN1N: C33.1 R17.2 U4.15 | length 10.7
  Top Layer w0.203: U4.15 91.007,69.902 91.567,69.342 92.808,69.342 93.54,68.61 C33.1 R17.2
IN1N_RAW: P1.10 R17.1 | length 15.3
  Top Layer w0.203: P1.10 93.662,60.642 94.996,61.976 98.806,61.976 101.473,64.643 101.473,66.355 99.278,68.55 R17.1
IN1P: C25.2 R12.2 U4.16 | length 8.3
  Top Layer w0.203: U4.16 91.507,71.815 91.948,71.374 92.808,71.374 93.54,70.642 C25.2 R12.2
IN1P_RAW: P1.9 R12.1 | length 18.6
  Top Layer w0.203: P1.9 93.755,57.751 95.089,57.751 101.854,64.516 101.854,68.707 99.949,70.612 R12.1
IN2N: C35.1 R19.2 U4.13 | length 15.7
  Top Layer w0.203: U4.13 90.007,65.949 90.678,65.278 92.808,65.278 93.54,64.546 C35.1 R19.2
IN2N_RAW: P1.8 R19.1 | length 10.2
  Top Layer w0.203: P1.8 94.742,62.738 98.552,62.738 99.278,63.464 R19.1
IN2P: C29.2 R14.2 U4.14 | length 13
  Top Layer w0.203: U4.14 90.507,68.243 91.44,67.31 92.808,67.31 93.54,66.578 C29.2 R14.2
IN2P_RAW: P1.7 R14.1 | length 15.9
  Top Layer w0.203: P1.7 92.708,58.704 92.708,60.196 94.869,62.357 98.679,62.357 100.838,64.516 100.838,65.532 99.899,66.471 99.354,66.471 R14.1
IN3N: C34.1 R18.2 U4.11 | length 13.4
  Top Layer w0.203: R18.2 C34.1 85.747,66.578 86.479,67.31 88.265,67.31 89.007,68.052 U4.11
IN3N_RAW: P1.6 R18.1 | length 15.9
  Top Layer w0.203: R18.1 80.022,66.518 78.613,65.109 78.613,64.125 80.83,61.907 87.413,61.907 P1.6
IN3P: C26.2 R13.2 U4.12 | length 16
  Top Layer w0.203: R13.2 C26.2 85.747,64.546 86.479,65.278 88.9,65.278 89.507,65.885 U4.12
IN3P_RAW: P1.5 R13.1 | length 16
  Top Layer w0.203: R13.1 80.022,63.218 80.955,62.286 88.383,62.286 90.616,60.053 90.616,58.612 P1.5
IN4N: C36.1 R20.2 U4.9 | length 8.2
  Top Layer w0.203: R20.2 C36.1 85.747,70.642 86.106,71 86.136,71 86.89,71.755 87.503,71.755 87.969,72.221 87.969,73.307 U4.9
IN4N_RAW: P1.4 R20.1 | length 19.1
  Top Layer w0.203: R20.1 80.022,70.582 77.902,68.462 77.902,63.83 80.645,61.087 85.979,61.087 87.408,59.658 P1.4
IN4P: C30.2 R15.2 U4.10 | length 10.9
  Top Layer w0.203: R15.2 C30.2 85.76,68.61 86.492,69.342 87.884,69.342 88.507,69.965 U4.10
IN4P_RAW: P1.3 R15.1 | length 20.2
  Top Layer w0.203: R15.1 80.022,68.55 78.257,66.785 78.257,63.977 80.767,61.468 87.349,61.468 88.616,60.201 88.616,58.612 P1.3
NetC4_1: C4.1 U2.7 | length 2.3
  Top Layer w0.3: U2.7 62.052,69.43 C4.1
NetC4_2: C4.2 U2.5 | length 2.4
  Top Layer w0.3: C4.2 60.752,69.542 U2.5
NetC5_1: C5.1 U2.8 | length 2.9
  Top Layer w0.3: U2.8 62.702,72.369 63.044,72.711 64.348,72.711 C5.1
NetC5_2: C5.2 U2.3 | length 10.4
  Top Layer w0.3: v1(61.341,73.914) 61.383,73.956 61.383,75.926 U2.3 ; C5.2 64.683,74.581 66.294,72.969 v1(66.294,72.898)
  Inner 2 w0.3: v1(61.341,73.914) 61.542,73.914 62.209,74.581 64.611,74.581 v1(66.294,72.898)
NetC6_2: C6.2 R3.2 U3.3 | length 5.5
  Top Layer w0.3: R3.2 C6.2 120.304,90.297 122.148,88.453 122.148,87.77 U3.3
NetC9_2: C9.2 C10.1 U4.24 | length 4.3
  Top Layer w0.3: U4.24 94.657,78.871 95.723,77.805 C9.2 97.363,77.805 C10.1
NetC13_2: C13.2 U4.60 | length 7.8
  Top Layer w0.3: C13.2 76.073,78.578 77.28,77.371 U4.60
NetC14_1: C14.1 U4.26 | length 2.6
  Top Layer w0.3: U4.26 94.707,79.871 95.4,80.564 95.435,80.564 95.735,80.864 C14.1
NetC15_1: C15.1 C16.2 U4.55 | length 4.9
  Top Layer w0.3: C15.1 79.225,81.534 C16.2 79.278,81.511 79.588,81.201 80.918,79.871 U4.55
NetC17_1: C17.1 U4.30 | length 3.2
  Top Layer w0.3: U4.30 94.561,81.871 95.51,82.82 95.51,83.341 C17.1
NetC18_1: C18.1 U4.28 | length 8.6
  Top Layer w0.3: U4.28 93.543,80.881 94.355,80.881 95.642,82.169 98.749,82.169 100.711,80.207 C18.1
NetD1_A: D1.A R5.2 | length 3.1
  Top Layer w0.3: D1.A R5.2
NetD2_A: D2.A R16.2 | length 3.8
  Top Layer w0.3: D2.A 53.51,87.503 R16.2
NetJ1_A5: J1.A5 R1.2 | length 2.3
  Top Layer w0.3: J1.A5 56.456,81.133 R1.2
NetJ1_B5: J1.B5 R2.1 | length 2.2
  Top Layer w0.3: J1.B5 56.517,78.133 R2.1
NetR4_1: R4.1 U3.27 | length 2.1
  Top Layer w0.3: U3.27 108.434,67.969 R4.1
NetR5_1: R5.1 U3.39 | length 2.3
  Top Layer w0.3: U3.39 123.695,69.993 123.695,67.712 R5.1
NetR8_1: R8.1 U4.42 | length 8.8
  Top Layer w0.3: R8.1 83.486,91.52 87.007,87.999 U4.42
NetR9_1: R9.1 U4.44 | length 6.8
  Top Layer w0.3: R9.1 82.871,89.885 83.47,89.885 86.007,87.348 U4.44
NetR10_1: R10.1 U4.45 | length 5.1
  Top Layer w0.3: R10.1@82.761,88.413 83.545,88.413 85.497,86.461 85.497,84.907 U4.45
NetR11_1: R11.1 U4.46 | length 3.5
  Top Layer w0.3: R11.1@82.761,86.866 82.79,86.837 83.876,86.837 85.007,85.706 U4.46
PWDN: U3.7 U4.35 | length 32.5
  Top Layer w0.3: U4.35 90.517,84.907 90.517,85.784 91.418,86.685 98.72,86.685 101.713,83.693 v1(102.87,83.693) ; v1(116.205,83.693) 117.324,84.812 U3.7
  Inner 2 w0.3: v1(102.87,83.693) v1(116.205,83.693)
REF_ELECTRODE: P1.1 U4.17 | length 40
  Top Layer w0.3: v1(75.819,63.627) 81.788,57.658 P1.1 ; U4.17@94.053,75.361 95.812,73.602 95.812,72.59 v1(95.885,72.517)
  Bottom Layer w0.3: v1(75.819,63.627) 87.503,63.627 95.699,71.823 95.699,72.331 v1(95.885,72.517)
RESET: U3.6 U4.36 | length 34.1
  Top Layer w0.3: U4.36 90.017,84.907 90.017,85.924 91.231,87.138 98.908,87.138 101.336,84.709 v1(105.41,84.709) ; U3.6 118.606,87.502 118.606,84.594 v1(118.618,84.582)
  Inner 2 w0.3: v1(105.41,84.709) 105.474,84.645 118.554,84.645 v1(118.618,84.582)
SPI_CLOCK: U3.20 U4.40 | length 28.6
  Top Layer w0.3: U4.40 88.017,84.907 88.017,85.924 90.605,88.512 101.577,88.512 102.205,87.884 v1(102.235,87.884) ; v1(105.628,79.72) 105.789,79.56 107.023,79.56 U3.20
  Bottom Layer w0.3: v1(102.235,87.884) 102.271,87.848 103.134,87.848 103.886,87.096 103.886,81.026 104.537,80.375 104.749,80.375 105.404,79.72 v1(105.628,79.72)
SPI_MISO: U3.21 U4.43 | length 26.5
  Top Layer w0.3: U4.43 86.507,84.123 86.937,83.693 86.95,83.693 87.171,83.472 89.629,83.472 91.459,83.472 91.902,83.914 91.902,83.949 91.949,83.997 91.949,84.699 91.959,84.709 91.959,85.084 91.949,85.094 91.949,85.218 92.456,85.725 98.298,85.725 105.894,78.129 U3.21
SPI_MOSI: U3.19 U4.34 | length 19.5
  Top Layer w0.3: U4.34 91.017,84.907 91.017,85.645 91.606,86.233 98.533,86.233 104.097,80.669 U3.19
START: U3.5 U4.38 | length 39.3
  Top Layer w0.3: U4.38 89.017,84.907 89.017,85.645 90.963,87.59 99.095,87.59 100.96,85.725 v1(102.235,85.725) ; U3.5 119.864,84.695 120.523,84.036 v1(120.523,83.82)
  Inner 2 w0.3: v1(102.235,85.725) 119.665,85.725 120.661,84.729 120.661,83.958 v1(120.523,83.82)
VBUS: C1.1 C3.1 J1.A4_B9 J1.B4_A9 U1.1 U1.3 U2.2 U2.6 | length 34.3
  Top Layer w0.3: U2.6@61.383,72.07 61.383,72.475 60.847,73.011 C3.1 58.776,73.011 57.404,74.383 57.404,75.502 55.573,77.333 54.435,77.333 54.135,77.633 53.632,77.633 52.955,78.31 52.955,81.456 53.632,82.133 54.135,82.133 J1.A4_B9 55.437,82.283 58.358,85.205 58.358,85.24 58.658,85.54 C1.1@58.728,85.54 ; U2.6 61.402,72.423 61.55,72.57 61.55,72.604 61.844,72.898 62.23,72.898 62.738,73.406 62.738,74.449 62.2,74.987 62.2,75.021 62.052,75.169 U2.2 ; U1.1@61.53,85.54 C1.1@58.728,85.54 ; U1.3 61.513,83.657 60.545,83.657 59.028,85.173 59.028,85.24 C1.1@58.728,85.54
pads on no net: J1. J1.A8 J1.B8 U1.4 U3.8 U3.9 U3.10 U3.11 U3.12 U3.15 U3.16 U3.17 U3.22 U3.23 U3.24 U3.25 U3.26 U3.28 U3.29 U3.30 U3.31 U3.32 U3.33 U3.34 U3.35 U3.36 U3.37 U3.38 U4.1 U4.2 U4.3 U4.4 U4.5 U4.6 U4.7 U4.8 U4.18 U4.27 U4.29 U4.62 U4.64

## Polygon pours and split planes (outlines as drawn)
GND on Inner 1 "NONET_L-01_P-001" (solid, remove dead copper, pour order 0): 46.736,95.123 126.238,95.123 126.238,55.118 46.736,55.118
GND on Top Layer "NONET_L-01_P-001" (solid, remove dead copper, pour order 1): 46.736,95.123 126.238,95.123 126.238,55.118 46.736,55.118

## Silkscreen, mask and mechanical layers (free items; w line width, h text height)
Top Overlay:
  text "IN-N" at 80.872,59.155 h0.8
  text "CORTEX DYNAMATICS / EEG ACQUISITION BOARD / REV A1" at 49.784,57.912 h1.52
  text "IN-P" at 80.872,57.123 h0.8
Mechanical 1:
  lines w0.051: 46.736,55.118 126.238,55.118 126.238,95.123 46.736,95.123 46.736,84.963 46.736,55.118

## Text inside footprints (layer, text, board x,y; h text height)
J1: Mechanical 13 "PCB EDGE" at 47.03,74.483 h0.8 r270
U3: Top Overlay "*" at 124.309,89.216 h0.8 r270; Mechanical 13 "*" at 124.309,86.447 h0.8 r270
U4: Top Overlay "*" at 84.011,71.723 h0.8 r90; Mechanical 13 "*" at 84.392,74.079 h0.8 r90